# Altium PCB RTL8316_STAND.PcbDoc (part 2 of 4)
Units mm, origin at the board's own origin, x right, y up, seen from the top; angles counter-clockwise.
Board outline 155 x 217 mm, 4 copper layers (Top, Ground, Power, Bottom), stack 1.012 mm thick; 305 components, 396 nets, 1247 pads, 345 vias.
Unrouted connection lines stored in the file: 59.
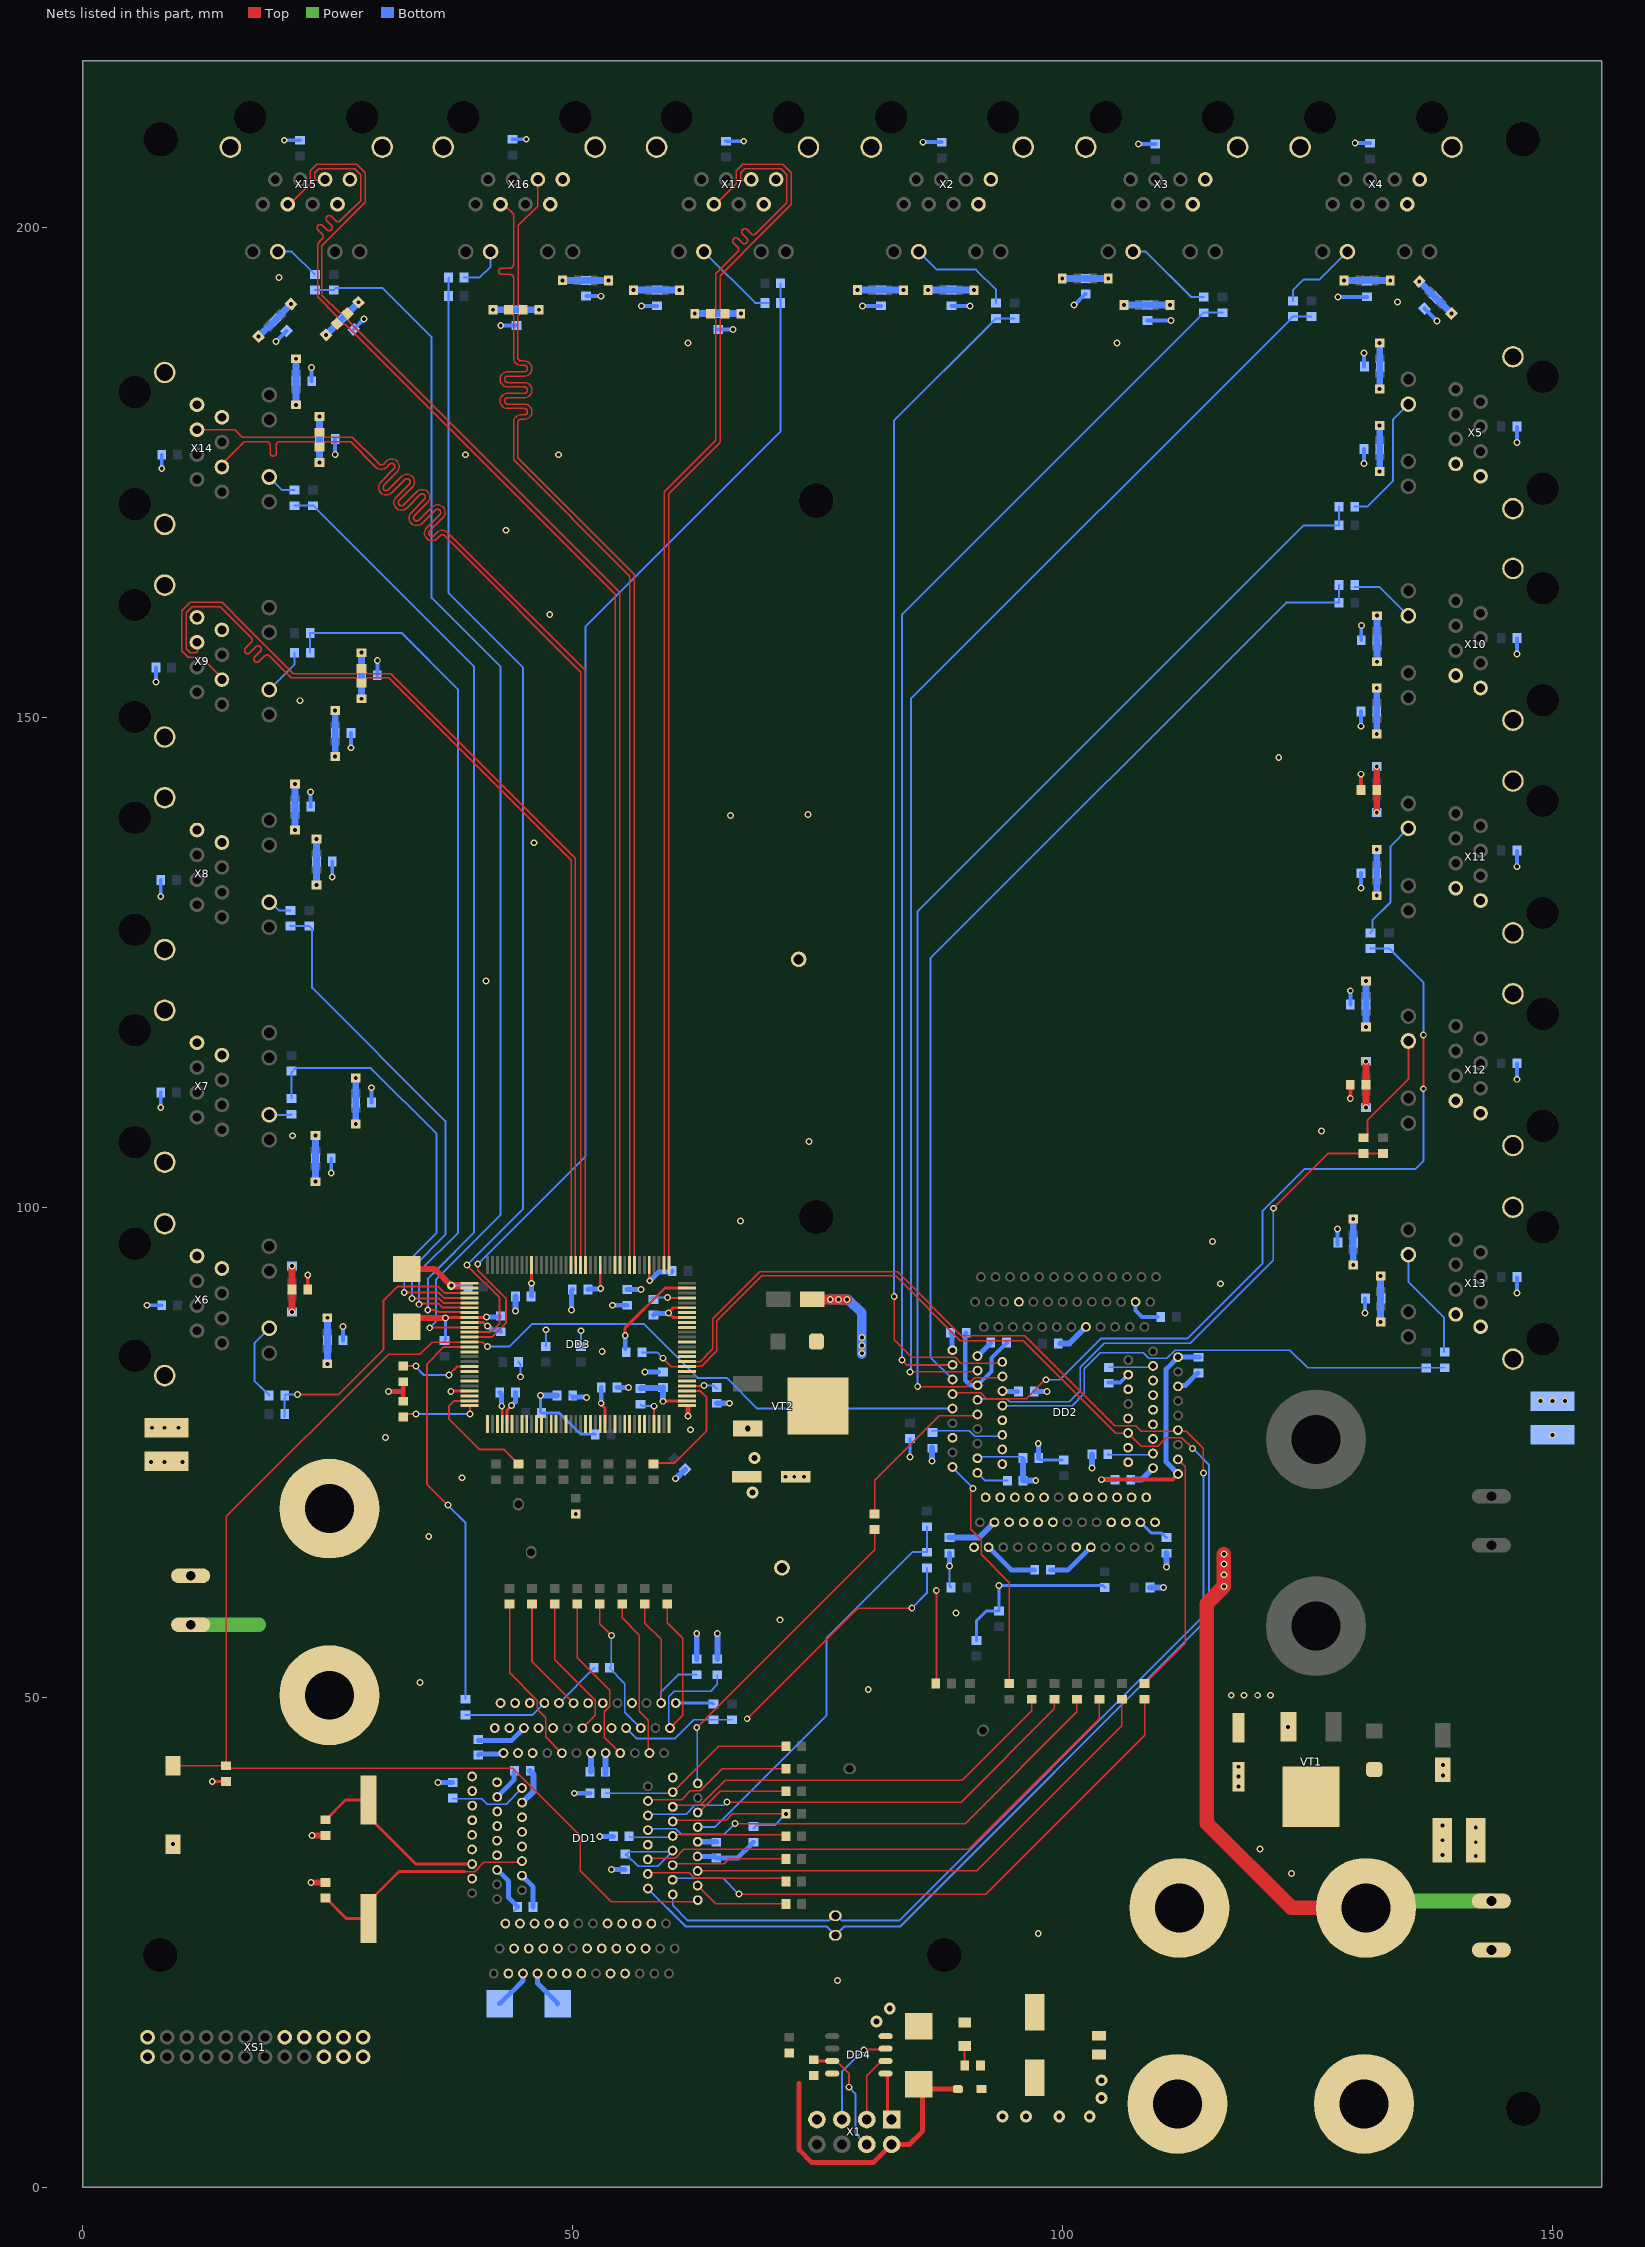
[diagram p4: the nets of this part, all layers, seen from the top]

## Via types
v1: diameter 0.7, hole 0.4, Top to Bottom, tented both sides, 332 vias
v2: diameter 1.2, hole 0.6, Top to Bottom, tented both sides, 11 vias
v3: diameter 0.9, hole 0.4, Top to Bottom, tented both sides, 2 vias

## Nets (pads, with @x,y where several pads share a name; then routed paths per layer and width w, separated by ;. In a path a pad name is that pad's centre, name@x,y a point inside that pad or via, vN(x,y) a via of type N, cw(c..) or ccw(c..) an arc to the next point about the centre after c; other vN are vias at no path point) (continued)
3V3: C4.1 C5.1 C13.1 C14.1 C27.1 C30.1 C31.1 C32.1 C33.1 C34.1 C35.1 C36.1 C37.1 DD3.46 DD3.68 DD3.103 DD3.127 R1.1 R3.1 R7.1 R11.1 R16.1 R34.1 R37.1 R71.2 R73.2 R74.2 SB2.1 SB3.1 VD1.1 VT1.2 VT2.2 XS2.1 XS3.1 XS4.1 | length 51.9
  Top w0.2: DD3.103@61.65,79.75 DD3.103@61.7,79.75
  Top w0.3: v1(13.2,41.4) R73.2@14.6,41.4 ; v1(37,88.7) 37.05,88.75 DD3.46@39.45,88.75 41.15,88.75 v1(41.2,88.8) ; v1(42.75,79.7) 42.8,79.65 DD3.68@42.8,77.9 ; v1(55.35,86.9) 55.35,87.7 59.4,91.75 DD3.127@61.65,91.75
  Top w0.5: v1(61.75,78.7) DD3.103@61.75,79.6 ; v2(67.85,77.42) VT2.2@68.35,76.92 ; C4.1@67.95,72.7 C4.1@67.75,72.5 68,72.5 C4.1@68.35,72.15 ; C13.1@97.1,11.2 C13.1@97.15,11.15
  Top w0.6: C27.1@33.85,88.6 33.95,88.7 v1(37,88.7)
  Top w0.7: VT1.2@122.95,46.9 VT1.2@123.05,47
  Top w1: C5.1@117.9,46.85 C5.1@117.95,46.9
  Bottom w0.2: C30.1@42.55,88.8 C30.1@42.65,88.9 ; R11.1@44.45,84.25 R11.1@44.45,84.2 44.65,84 v1(44.65,82.7) ; R7.1@47.25,85.8 v1(47.25,87.5) ; R3.1@50.85,85.8 v1(50.85,87.4) ; R74.2@55.35,85.582 R74.2@55.45,85.482 ; 58.668,83.282 C34.1@58.75,83.2
  Bottom w0.3: R16.1@36.9,86.4 37,86.5 v1(37,88.7) ; v1(46.7,80.8) 46.7,79.1 R1.1@46.8,79 48.625,79 50.775,76.85 52.25,76.85 R37.1@52.3,76.8
  Bottom w0.5: v1(41.2,88.8) C30.1@42.55,88.8 ; C31.1@42.55,81.1 42.712,80.938 42.712,79.738 v1(42.75,79.7) ; v1(49.85,89.5) 49.85,91.5 C37.1@49.95,91.6 ; v1(54.05,90) C36.1@55.55,90 ; C33.1@54.5,81.6 v1(55.7,81.6) ; R74.2@55.35,85.582 v1(55.35,86.9) ; v1(57.35,83.2) C34.1@58.75,83.2
  Bottom w0.6: v1(44.15,89.4) C35.1@44.15,90.9 ; v1(46.7,80.8) C32.1@48.4,80.8
  other v1: 123,46.95 117.2,50.2 118.5,50.2 119.9,50.2 121.2,50.2 50.3,68.7
  other v2: 93.85,7.2 96.25,7.2 99.65,7.2 102.75,7.2 103.95,9.1 103.95,10.9 68.35,70.9 68.55,74.4
3V3_8208_DUT: C15.1 C16.1 C17.1 C18.1 C19.1 C20.1 C21.1 C22.1 DD2.46 DD2.68 DD2.103 DD2.127 R2.1 R4.1 R8.1 R12.1 R15.1 R33.1 R38.1 SB3.2 XS4.2 | length 142.4
  Top w0.2: R12.1@87.05,51.4 87.1,51.45 v1(87.1,60.9)
  Top w0.4: v1@103.959,72.2 111.185,72.2 DD2.103@111.77,72.785
  Top w1.5: v1(116.45,64.6) v1(116.45,63.6) v1(116.45,62.5) v1(116.45,61.3) 114.7,59.55 114.7,37.15 123.35,28.5 XS4.2@130.95,28.5
  Power w1: XS4.2@130.95,28.5 XS4.2@131.65,29.2 ; SB3.2@143.75,29.2 SB3.2@144.411,29.2
  Power w1.5: XS4.2@131.65,29.2 SB3.2@143.75,29.2
  Bottom w0.2: v1(88.45,63.4) 88.45,61.35 R8.1@88.6,61.2 ; C21.1@113.945,84.705 C21.1@113.95,84.7
  Bottom w0.3: v1(84.4,74.5) R15.1@84.4,76.4 ; R2.1@91.2,55.8 91.2,57.8 92.2,58.8 R4.1@93.5,58.8 v1(93.5,61.4) 104.1,61.4 R38.1@104.3,61.2 ; C17.1@97.55,74.4 97.75,74.2 R33.1@99.988,74.2
  Bottom w0.4: DD2.46@91.31,81.84 92.723,83.253 92.723,84.623 C22.1@94.25,86.15
  Bottom w0.5: v1(88.45,63.4) C19.1@88.45,64.7 ; C20.1@90.15,87.2 90.05,87.1 90.05,82.35 90.56,81.84 DD2.46@91.31,81.84 ; DD2.68@92.44,65.3 94.74,63 C16.1@97.145,63 ; C22.1@94.25,86.15 C22.1@94.25,86.2 ; C15.1@97.1,81.2 v1(98.4,81.2) ; v1(97.5,75.9) 97.525,75.875 97.525,74.425 C17.1@97.55,74.4 ; v1(103.95,72.2) C18.1@105.35,72.2 ; DD2.103@111.77,72.785 110.55,74.005 110.55,83.485 DD2.127@111.77,84.705 C21.1@113.945,84.705
3V3_8316: C6.1 C7.1 C8.1 C9.1 C10.1 C11.1 C12.1 DD1.10 DD1.14 DD1.15 DD1.19 DD1.25 DD1.32 DD1.43 DD1.54 DD1.59 DD1.60 DD1.71 DD1.83 DD1.96 DD1.112 DD1.128 R19.1 R23.1 R30.1 R36.1 SB2.2 XS1.1 XS1.3 XS1.5 XS1.7 XS1.9 XS3.2 | length 66.2
  Top w0.15: v1(67.8,47.8) 79.1,59.1 v1(84.6,59.1)
  Power w1.5: SB2.2@11,57.4 17.95,57.4
  Bottom w0.2: C7.1@45.95,28.6 C7.1@45.965,28.585 ; DD1.25@48.59,49.4 48.6,49.4 52.15,52.95 R30.1@52.15,53 ; C9.1@53.35,42.2 C9.1@53.355,42.205 ; C10.1@64.495,33.755 C10.1@64.65,33.6 ; R23.1@68.2,34.993 68.407,35.2 R23.1@68.45,35.2 ; v1(84.6,59.1) 86.15,60.65 R36.1@86.15,63.2
  Bottom w0.5: C11.1@40.35,45.6 43.765,45.6 DD1.32@45.015,46.85 ; DD1.43@42.29,39.83 43.98,41.52 C8.1@43.98,42.38 ; C6.1@42.527,18.727 43.65,19.85 43.7,19.85 44.914,21.064 44.914,21.796 DD1.71@44.91,21.8 ; DD1.59@44.815,31.785 45.95,30.65 C7.1@45.95,28.6 ; v1(52.75,35.8) R19.1@54.15,35.8 ; v1(53.95,32.4) C12.1@55.35,32.4 ; DD1.112@62.74,33.755 C10.1@64.495,33.755 ; C10.1@64.65,33.6 66.85,33.6 68.2,34.95 68.2,35 68.4,35.2 R23.1@68.45,35.2
  Bottom w0.6: C9.1@53.355,42.205 DD1.15@53.355,44.3
AGND: C20.2 C21.2 C22.2 C25.2 C26.2 C27.2 C28.2 C29.2 C35.2 C36.2 C37.2 C38.2 C39.2 C40.2 C41.2 C42.2 C43.2 C44.2 C45.2 C46.2 C47.2 C48.2 C49.2 C50.2 C51.2 C52.2 C53.2 C54.2 C55.2 C56.2 C57.2 C58.2 C59.2 C60.2 C61.2 C62.2 C63.2 C64.2 C65.2 C66.2 C67.2 C68.2 C69.2 C70.2 C71.2 C72.2 C73.2 C74.2 C75.2 C76.2 C77.2 C78.2 C79.2 C80.2 C81.2 C82.2 C83.2 C84.2 C85.2 DD2.5 DD2.15 DD2.29 DD2.39 DD2.40 DD2.121 DD2.123 DD3.5 DD3.15 DD3.29 DD3.39 DD3.40 DD3.121 DD3.123 L1.1 L2.1 R75.1 R76.1 TP7.1 X2.8 X2.13 X3.8 X3.13 X4.8 X4.13 X5.8 X5.13 X6.8 X6.13 X7.8 X7.13 X8.8 X8.13 X9.8 X9.13 X10.8 X10.13 X11.8 X11.13 X12.8 X12.13 X13.8 X13.13 X14.8 X14.13 X15.8 X15.13 X16.8 X16.13 X17.8 X17.13 | length 122.6
  Top w0.2: v1@59.75,89.239 v1(59.75,89.2) v1@59.769,89.2
  Top w0.3: v3(37.6,92) v3@37.762,92 ; DD3.40@39.45,91.75 38.012,91.75 v3@37.762,92 ; DD3.39@39.45,92.25 38.012,92.25 v3@37.762,92 ; v1(45.8,92.25) DD3.29@45.8,94.1 ; DD3.15@52.8,94.1 52.8,91.75 v1(52.85,91.7) ; DD3.5@57.8,94.1 57.8,92.55 v1(57.85,92.5) ; v1@59.75,89.239 60.261,89.75 DD3.123@61.65,89.75 ; v1@59.769,89.2 60.219,88.75 DD3.121@61.65,88.75
  Top w0.4: C47.2@22.95,91.6 v1(22.95,93.1) ; v1@129.35,111.2 C59.2@129.35,112.5 ; C56.2@130.45,142.6 v1(130.45,144.2)
  Top w0.6: C27.2@33.05,93.7 35.9,93.7 v3(37.6,92)
  Top w1: X13.13@145.95,84.423 X13.13@145.95,84.5
  Bottom w0.2: C35.2@45.75,90.9 C35.2@45.8,90.95 ; C20.2@88.435,87.215 C20.2@88.585,87.215
  Bottom w0.4: v1(6.55,90) C70.2@8.05,90 ; v1(7.45,153.6) C83.2@7.45,155.1 ; v1(7.95,110.2) C71.2@7.95,111.7 ; v1(7.95,131.7) C75.2@7.95,133.4 ; v1(8.05,175.4) C82.2@8.05,176.8 ; v1(19.706,188.356) C64.2@20.767,189.417 ; v1(20.55,208.9) C78.2@22.15,208.9 ; C50.2@23.225,140.878 v1(23.225,142.378) ; C62.2@23.35,184.3 v1(23.35,185.7) ; v1(25.35,103.5) C48.2@25.35,105 ; v1(25.45,133.7) C51.2@25.45,135.3 ; v1(25.751,176.817) C63.2@25.751,178.417 ; C46.2@26.55,86.425 v1(26.55,87.825) ; v1(27.35,146.9) C52.2@27.35,148.4 ; C65.2@27.647,189.607 v1(28.708,190.668) ; C49.2@29.45,110.7 v1(29.45,112.2) ; C53.2@30.05,154.3 v1(30.05,155.8) ; v1(42.65,190) C67.2@44.25,190 ; C79.2@43.85,209 v1(45.25,209) ; C66.2@51.391,192.984 v1@52.791,192.984 ; v1(57,192) C68.2@58.6,192 ; C69.2@64.85,189.6 v1(66.35,189.6) ; C74.2@65.65,208.8 v1(67.45,208.8) ; v1(79.55,192) C38.2@81.45,192 ; v1(85.75,208.7) C85.2@87.65,208.7 ; C39.2@88.65,192 v1(90.55,192) ; DD2.40@91.3,84.82 DD2.40@91.3,84.952 ; v1(101.15,192.1) 101.2,192.1 102.3,193.2 C40.2@102.35,193.2 ; R76.1@104.65,82.1 105.87,82.1 DD2.123@106.685,82.915 ; DD2.5@107.445,90.35 107.445,89.455 108.1,88.8 C29.2@109.7,88.8 ; v1(107.75,208.5) C81.2@109.45,208.5 ; C41.2@108.65,190.5 v1(111.05,190.5) ; DD2.121@111.77,81.725 DD2.121@111.875,81.83 ; C21.2@113.8,83.1 C21.2@113.85,83.1 ; C60.2@128.05,96.195 128.05,96.4 v1(128.05,97.8) ; v1(128.1,192.9) 128.111,192.911 131.057,192.911 C43.2@131.068,192.922 ; v1(129.35,111.1) v1@129.35,111.2 ; C58.2@129.35,120.7 v1(129.35,122.1) ; v1(129.85,208.6) C80.2@131.35,208.6 ; v1(130.45,132.6) C57.2@130.45,134.1 ; v1(130.45,149.1) C54.2@130.45,150.6 ; C55.2@130.465,157.88 v1@130.465,159.38 ; v1(130.75,175.9) C45.2@130.75,177.4 ; C44.2@130.75,185.8 v1(130.75,187.2) ; v1(130.85,89.2) C61.2@130.85,90.7 ; C42.2@136.909,191.707 v1(138.182,190.434) ; v1(146.35,91.26) C77.2@146.35,92.86 ; v1(146.35,113.06) C76.2@146.35,114.66 ; v1(146.35,134.76) C84.2@146.35,136.36 ; v1(146.35,156.46) C73.2@146.35,158.06 ; v1(146.35,178.06) C72.2@146.35,179.66
  Bottom w0.5: v3(37.6,92) 39.5,92 C26.2@39.5,92.05 ; C35.2@45.8,90.95 v1(45.8,92.25) ; C37.2@51.55,91.6 51.612,91.662 52.812,91.662 v1(52.85,91.7) ; C36.2@55.55,91.6 v1(56.95,91.6) ; v1(57.85,92.5) 57.881,92.5 58.781,93.4 60.05,93.4 C25.2@60.15,93.5 ; R75.1@58.25,89 58.412,89.162 59.712,89.162 v1(59.75,89.2) ; C20.2@88.585,87.215 88.7,87.1 88.7,85.465 DD2.39@88.75,85.415 ; DD2.40@91.3,84.82 91.32,84.82 92.65,86.15 C22.2@92.65,86.2 ; DD2.121@111.875,81.83 112.53,81.83 C21.2@113.8,83.1
  Bottom w0.6: C28.2@99.75,86.1 100.675,86.1 DD2.15@102.375,87.8
  other v1: 7.05,77.5 8.35,77.5 9.75,77.5 148.75,80.25 150,80.25 151.25,80.25 130.475,159.375 52.869,192.984
DGND: C1.2 C2.2 C3.2 C4.2 C5.2 C6.2 C7.2 C8.2 C9.2 C10.2 C11.2 C12.2 C15.2 C16.2 C17.2 C18.2 C19.2 C23.2 C24.2 C30.2 C31.2 C32.2 C33.2 C34.2 DD1.1 DD1.18 DD1.26 DD1.33 DD1.36 DD1.44 DD1.55 DD1.58 DD1.70 DD1.74 DD1.91 DD1.97 DD1.113 DD1.115 DD2.47 DD2.61 DD2.69 DD2.89 DD2.104 DD3.47 DD3.61 DD3.69 DD3.89 DD3.104 DD4.4 L3.2 R22.1 R26.1 R27.1 R35.1 R41.1 R42.1 R49.1 R50.1 R55.1 R56.1 R61.1 R62.1 R67.1 R68.1 R72.2 SB1.1 TP8.1 VD2.1 X1.7 XS1.2 XS1.4 XS1.6 XS1.23 XS1.24 | length 115.5
  Top w0.2: v1(37.55,81.2) 37.75,81.2 v1@37.8,81.25
  Top w0.3: v1@37.8,81.25 DD3.61@39.45,81.25 ; DD3.47@39.45,88.25 40.842,88.25 41.192,87.9 v1(41.3,87.9) ; DD3.69@43.3,77.9 43.3,79.304 v1(43.75,79.754) ; v1(52.9,80) 52.9,79.892 53.3,79.492 DD3.89@53.3,77.9 ; v1(59.2,80.2) 59.25,80.25 DD3.104@61.65,80.25
  Top w0.4: v1(117.95,41.9) 117.95,42.85 C5.2@118,42.9
  Top w0.5: v1(31.2,81.2) 32.7,81.2 ; R62.1@32.7,80.2 32.7,81.2 ; R68.1@32.7,82.2 32.7,81.2 ; C4.2@72.75,72.5 v1(73.6,72.5)
  Top w0.6: v1(23.3,31.1) C3.2@24.75,31.1 ; v1(23.4,35.9) C2.2@24.75,35.9 ; v1(138.75,35.4) L3.2@138.8,35.45 ; C23.2@138.8,42.6 v1(138.8,43.1)
  Top w1: C24.2@74.45,90.6 v1(78,90.6)
  Bottom w0.15: C12.2@55.35,33.8 55.35,33.82 55.75,34.22 60.06,34.22 DD1.113@60.19,34.35 60.115,34.275 60.115,34.165 58.68,32.73 56.67,32.73 55.465,33.935 55.4,34 C12.2@55.35,34 ; DD2.61@91.43,74.52 C17.2@95.95,74.52
  Bottom w0.2: DD1.55@42.28,33.87 DD1.55@42.41,34 ; C7.2@44,28.2 C7.2@44.35,28.55 ; C32.2@49.7,80.9 C32.2@50,80.6 ; C10.2@64.605,35.245 C10.2@64.65,35.2 ; DD2.61@91.17,74.26 DD2.61@91.43,74.52 ; C16.2@98.745,63 C16.2@98.765,63.02
  Bottom w0.3: DD1.33@44.55,43.989 44.539,44 44.539,44.154 DD1.33@44.55,44.165 ; DD1.1@60.51,49.4 64.25,49.4 R35.1@64.35,49.3
  Bottom w0.5: v1(36.25,41.3) R72.2@37.75,41.3 ; C11.2@40.35,44.1 40.45,44.2 42.703,44.2 42.803,44.3 DD1.36@42.925,44.3 ; v1(41.3,87.9) 41.354,87.9 41.754,87.5 42.45,87.5 C30.2@42.65,87.3 ; DD1.58@42.28,32.38 43.45,31.21 43.45,29.55 44.35,28.65 C7.2@44.35,28.6 ; v1(43.75,79.754) 44.139,80.143 44.139,81.089 C31.2@44.15,81.1 ; DD1.33@44.415,44.178 DD1.33@44.415,44.3 ; DD1.74@46.4,21.8 46.4,20.8 48.45,18.75 C6.2@48.45,18.7 ; C32.2@50,80.6 50.038,80.638 51.362,80.638 v1(51.4,80.6) ; v1(50.15,40.2) R27.1@51.75,40.2 ; v1(52.9,80) C33.2@52.9,81.6 ; DD2.47@93.845,81.245 93.881,81.209 C15.2@95.4,81.209 ; C16.2@98.745,63 100.57,63 DD2.89@102.87,65.3
  Bottom w0.6: DD1.44@44.825,39.235 46,40.41 46,42.1 45.65,42.45 C8.2@45.65,42.5 ; C9.2@51.865,42.4 DD1.18@51.865,44.29 ; R56.1@56.9,81.5 56.95,81.55 59.15,81.55 C34.2@59.2,81.6 v1(59.2,80.2) ; v1(60.5,72.3) 60.516,72.3 61.45,73.234 R41.1@61.466,73.234 ; R26.1@62.65,53.9 v1(62.65,56.5) ; DD1.115@62.75,35.245 C10.2@64.605,35.245 ; R50.1@64.7,80 v1(66,80) ; R22.1@64.75,53.9 v1(64.75,56.5) ; v1(86.65,74.1) R67.1@86.65,75.5 ; C19.2@88.45,66.3 91.485,66.3 DD2.69@93.035,67.85 ; C17.2@95.95,74.2 R61.1@95.95,72.1 v1(97.25,72.1) ; v1(103,73.4) R49.1@103,74.8 ; C18.2@107.25,72.2 108.04,72.2 DD2.104@109.22,73.38 ; R42.1@108.9,61.2 v1(110.3,61.2) ; v1(110.6,63.3) R55.1@110.6,64.7
  Bottom w1: v1(76.275,90.6) 78.1,90.6 79.5,89.2 v1(79.5,85.1) v1@79.5,85
  other v1: 138.75,33.9 9.2,35 138.75,36.9 117.95,40.9 138.8,42 117.95,42.9 71.7,72.5 72.6,72.5 79.5,85.9 79.5,86.7 77.1,90.6
  other v2: 81,16.9 82.344,18.244
EEP_PWR: C1.1 DD4.8 R69.2 R70.2 VD1.2 X1.2 | length 29.5
  Top w0.5: 73.1,10.6 73.1,3.8 74.4,2.5 80.68,2.5 X1.2@82.54,4.36 84.36,4.36 85.7,5.7 85.7,10 VD1.2@89.3,10 ; R69.2@74.4,11.5 R69.2@74.63,11.27 ; DD4.8@76.438,11.558 DD4.8@76.475,11.595
G+1: R141.1 X17.10 | length 8.8
  Bottom w0.2: X17.10@63.38,197.53 68.61,192.3 R141.1@70,192.3
G+2: R145.1 X16.10 | length 4.7
  Bottom w0.2: R145.1@38.9,194.9 40.5,194.9 41.605,196.005 X16.10@41.605,197.53
G+3: R149.1 X15.10 | length 4.8
  Bottom w0.2: X15.10@19.885,197.53 21.32,197.53 23.65,195.2 R149.1@23.7,195.2
G+4: R153.1 X14.10 | length 3.1
  Bottom w0.2: X14.10@19.02,174.53 20.35,173.2 R153.1@21.6,173.2
G+5: R157.1 X9.10 | length 4.8
  Bottom w0.2: X9.10@19.02,152.83 21.6,155.41 R157.1@21.6,156.6
G+6: R161.1 X8.10 | length 2.5
  Bottom w0.2: X8.10@19.02,131.13 19.17,131.13 20,130.3 R161.1@21.2,130.3
G+7: R165.1 X7.10 | length 2.3
  Bottom w0.2: X7.10@19.02,109.43 21.23,109.43 R165.1@21.3,109.5
G+8: R169.1 X6.10 | length 8.1
  Bottom w0.2: R169.1@19,80.8 19,80.85 18.65,81.2 18.6,81.2 17.5,82.3 17.5,86.135 X6.10@19.02,87.655
G+9: R142.2 X13.10 | length 11.5
  Bottom w0.2: X13.10@135.28,95.17 135.28,92.382 138.9,88.762 138.9,85.303 R142.2@138.988,85.215
G+10: R146.2 X12.10 | length 11.8
  Top w0.2: R146.2@130.7,107.1 130.75,107.1 131.1,107.45 131.1,108.9 135.28,113.08 X12.10@135.28,116.97
G+11: R150.2 X11.10 | length 12.3
  Bottom w0.2: R150.2@131.4,128 131.6,128.2 131.6,129.3 133.456,131.156 133.456,136.846 X11.10@135.28,138.67
G+12: R154.2 X10.10 | length 6.7
  Bottom w0.2: R154.2@129.8,163.3 132.35,163.3 X10.10@135.28,160.37
G+13: R158.2 X5.10 | length 13.5
  Bottom w0.2: R158.2@129.8,171.5 131.1,171.5 133.7,174.1 133.7,180.39 X5.10@135.28,181.97
G+14: R162.2 X4.10 | length 8.3
  Bottom w0.2: R162.2@123.5,192.5 123.5,193.6 124.6,194.7 126.23,194.7 X4.10@129.06,197.53
G+15: R166.2 X3.10 | length 9.1
  Bottom w0.2: X3.10@107.18,197.53 108.47,197.53 113.1,192.9 R166.2@114.4,192.9
G+16: R170.2 X2.10 | length 10.8
  Bottom w0.2: X2.10@85.3,197.53 87.13,195.7 91.134,195.7 93.2,193.634 R170.2@93.2,192.3
GND: C13.2 C14.2 L1.2 L2.2 L3.1 XS2.2
  other v1: 77,21.1 97.5,25.9 123.35,32 142.15,33.8 120.15,34.5 142.15,35.2 142.15,36.7 80.15,50.8 34.4,51.5 71.15,57.9 89.1,58.6 35.3,66.4 38.7,72.4 6.95,74 8.35,74 10.15,74 30.9,76.5 150,76.75 62,77.3 53,85.3 116.1,92.2 115.3,96.5 67.1,98.6 74.1,106.7 21.4,107.3 126.4,107.8 41.15,123.1 46.05,137.2 66.1,140 74,140.1 122.05,145.9 22.15,151.7 47.65,160.5 43.2,169.1 39.05,176.8 48.55,176.8 61.75,188.2 105.55,188.2 134.15,192.4 20,194.9
LED0: DD3.50 R141.2 R143.2 | length 124.4
  Top w0.2: DD3.50@39.45,86.75 41.716,86.75 43.2,88.234 43.2,90.666 40.3,93.566 v1(40.3,94.2)
  Bottom w0.2: v1(40.3,94.2) 51.3,105.2 51.3,159.3 71.2,179.2 R141.2@71.2,192.3 R143.2@71.2,194.3
LED1: DD3.49 R145.2 R147.2 | length 117.1
  Top w0.2: v1(39.2,94.1) 42.5,90.8 42.5,88.1 41.65,87.25 DD3.49@39.45,87.25
  Bottom w0.2: R145.2@37.3,194.9 R147.2@37.3,193 37.3,162.7 44.9,155.1 44.9,99.8 v1(39.2,94.1)
LED2: DD3.48 R149.2 R151.2 | length 125.1
  Top w0.2: v1(35.4,87.7) 35.45,87.75 DD3.48@39.45,87.75
  Bottom w0.2: R149.2@23.7,193.6 R151.2@25.6,193.6 25.8,193.8 30.6,193.8 35.6,188.8 35.6,162.2 42.6,155.2 42.6,99.2 36.05,92.65 36.05,88.35 v1(35.4,87.7)
LED3: DD3.45 R153.2 R155.2 | length 97.1
  Top w0.2: v1(35.2,89.5) 36.1,89.5 36.3,89.3 38.508,89.3 39.4,89.3 DD3.45@39.45,89.25
  Bottom w0.2: R153.2@21.6,171.6 R155.2@23.5,171.6 23.55,171.6 23.9,171.25 23.9,171.2 39.9,155.2 39.9,97.4 36.1,93.6 35.2,92.7 v1(35.2,89.5)
LED4: DD3.44 R157.2 R159.2 | length 89.3
  Top w0.2: v1(34.3,90.1) 34.435,90.1 34.535,90.2 36.263,90.2 36.713,89.75 DD3.44@39.45,89.75
  Bottom w0.2: R157.2@23.2,156.6 23.2,158.6 32.5,158.6 32.517,158.617 38.3,152.834 38.3,97.4 34.3,93.4 v1(34.3,90.1)
LED5: DD3.43 R161.2 R163.2 | length 53.1
  Top w0.2: v1(33.6,90.7) 36.329,90.7 36.779,90.25 DD3.43@39.45,90.25
  Bottom w0.2: R161.2@21.2,128.7 R163.2@23.1,128.7 23.4,128.4 23.4,122.4 37,108.8 37,97.2 33.6,93.8 v1(33.6,90.7)
LED6: DD3.42 R165.2 R167.2 | length 44.9
  Top w0.2: v1(32.8,91.3) 36.294,91.3 36.844,90.75 DD3.42@39.45,90.75
  Bottom w0.2: R165.2@21.3,111.1 21.3,113.8 21.7,114.2 29.4,114.2 36.1,107.5 36.1,97.4 32.8,94.1 v1(32.8,91.3)
LED7: DD3.41 R169.2 R171.2 | length 28.7
  Top w0.2: v1(21.9,80.9) 26.1,80.9 30.7,85.5 30.7,90.5 32.096,91.896 32.547,91.896 32.551,91.9 36.26,91.9 36.91,91.25 DD3.41@39.45,91.25
  Bottom w0.2: R171.2@20.6,78.6 20.6,80.5 R169.2@20.7,80.6 ; R169.2@20.6,80.8 20.7,80.9 v1(21.9,80.9)
LED8: DD2.50 R142.1 R144.1 | length 50.2
  Bottom w0.15: DD2.50@93.845,79.755 100.955,79.755 102.2,81 102.2,83.5 103.83,85.13 108.222,85.13 108.777,84.575 110.615,84.575 111.47,85.43 123.17,85.43 125,83.6 R144.1@137.1,83.6 137.115,83.615 R142.1@138.988,83.615
LED9: DD2.49 R146.1 R148.1 | length 56.6
  Top w0.2: v1(121.5,99.9) 127.1,105.5 R146.1@130.7,105.5 R148.1@132.7,105.5
  Bottom w0.15: DD2.49@91.31,80.35 91.44,80.48 94.275,80.48 94.6,80.155 100.655,80.155 101.8,81.3 101.8,83.666 104.234,86.1 113,86.1 121.5,94.6 v1(121.5,99.9)
LED10: DD2.48 R150.1 R152.1 | length 86.6
  Top w0.15: DD2.48@88.76,80.945 88.89,81.075 91.61,81.075 92.205,80.48 96.261,80.48 98.181,82.4 v1(98.3,82.4)
  Top w0.2: v1(136.8,112.1) v1(136.8,117.6)
  Bottom w0.2: v1(98.3,82.4) 99.7,82.4 103.9,86.6 112.7,86.6 120.4,94.3 120.4,99.649 124.651,103.9 135.983,103.9 136.8,104.717 v1(136.8,112.1) ; R150.1@131.4,126.4 R152.1@133.3,126.4 133.35,126.4 136.8,122.95 v1(136.8,117.6)
LED11: DD2.45 R154.1 R156.1 | length 102.4
  Bottom w0.2: DD2.45@88.76,82.435 86.5,84.695 86.5,125.4 122.8,161.7 R156.1@128.2,161.7 R154.1@128.2,163.5
LED12: DD2.44 R158.1 R160.1 | length 118.8
  Top w0.15: v1(85.2,81.7) 90.145,81.7 91.036,82.591 93.701,82.591 DD2.44@93.845,82.735
  Bottom w0.2: v1(85.2,81.7) 85.2,130.2 124.6,169.6 R160.1@128.2,169.6 R158.1@128.2,171.5
LED13: DD2.43 R162.1 R164.1 | length 132.8
  Top w0.15: v1(84.4,83.2) 91.18,83.2 DD2.43@91.31,83.33
  Bottom w0.2: v1(84.4,83.2) 84.496,83.296 84.496,83.563 84.5,83.567 84.5,151.9 123.1,190.5 123.1,190.55 123.45,190.9 R162.1@123.5,190.9 R164.1@125.4,190.9
LED14: DD2.42 R166.1 R168.1 | length 126.9
  Top w0.2: v1(83.6,84.4) 84.075,83.925 DD2.42@88.76,83.925
  Bottom w0.2: v1(83.6,84.4) 83.6,160.5 114,190.9 114,190.95 114.35,191.3 R166.1@114.4,191.3 R168.1@116.3,191.3
LED15: DD2.41 R170.1 R172.1 | length 122.5
  Top w0.15: v1(82.8,90.9) 82.8,86.5 84.61,84.69 89.02,84.69 89.615,84.095 93.705,84.095 DD2.41@93.835,84.225
  Bottom w0.2: v1(82.8,90.9) 82.8,180.3 92.8,190.3 92.8,190.35 93.15,190.7 R172.1@95.1,190.7
MDC: DD1.104 DD2.112 DD3.112 TP5.1 | length 152.4
  Top w0.15: DD3.112@61.65,84.25 63,84.25 64.3,85.55 64.3,88.6 69.1,93.4 83.15,93.4 89.65,86.9 96.15,86.9 105.33,77.72 107.43,77.72 108.025,77.125 111.63,77.125 DD2.112@111.76,77.255 111.89,77.124 112.626,77.124 114.35,75.4 v1(114.35,72.9)
  Bottom w0.2: DD1.104@60.2,29.88 60.2,28.75 61.75,27.2 76.1,27.2 76.6,27.7 76.936,27.7 77.436,27.2 83.3,27.2 114.35,58.25 v1(114.35,72.9) ; DD2.112@111.63,77.125 DD2.112@111.76,77.255
MDIO: DD1.105 DD2.111 DD3.111 R74.1 TP6.1 | length 161.1
  Top w0.15: v1(59.2,84.6) 60.05,83.75 DD3.111@61.65,83.75 61.7,83.8 63.15,83.8 64.7,85.35 64.7,88.4 69.3,93 82.95,93 89.55,86.4 95.95,86.4 105.395,76.955 DD2.111@106.675,76.955 107.995,75.635 109.702,75.635 110.557,76.49 112.16,76.49 v1(113.25,75.4)
  Bottom w0.2: R74.1@57.05,85.2 58.6,85.2 v1(59.2,84.6) ; DD1.105@57.665,30.475 61.54,26.6 75.9,26.6 TP6.1@76.8,25.7 77.7,26.6 83.4,26.6 114.95,58.15 114.95,73.7 v1(113.25,75.4)
NC1: DD4.1 X1.1 | length 5
  Top w0.3: DD4.1@81.925,11.595 81.961,11.595 82.1,11.456 82.1,7.34 X1.1@82.54,6.9
NC2: DD4.2 X1.3 | length 7
  Top w0.2: X1.3@80,6.9 80,11.365 81.5,12.865 DD4.2@81.925,12.865
NC3: DD4.3 X1.5 | length 10.3
  Top w0.2: v1(79.7,14) 79.768,14.068 81.857,14.068 DD4.3@81.925,14.135
  Bottom w0.2: X1.5@77.46,6.9 77.46,11.76 v1(79.7,14)
NetC2_1: C2.1 DD1.57 ZQ1.2 | length 20.4
  Top w0.3: C2.1@24.75,37.5 24.8,37.5 26.8,39.5 ZQ1.2@29.15,39.5 ZQ1.2@29.15,38.75 ; ZQ1.2@28.5,38.1 ZQ1.2@29.15,38.75 ; DD1.57@39.73,32.975 33.975,32.975 29.15,37.8 ZQ1.2@29.15,38.75
NetC3_1: C3.1 DD1.56 ZQ1.1 | length 24.4
  Top w0.15: 38.96,32.21 39.99,32.21 40.925,33.145 DD1.56@44.685,33.145
  Top w0.2: ZQ1.1@29.15,27.4 ZQ1.1@29.15,29.1 ; 38.95,32.2 38.96,32.21 ; DD1.56@44.685,33.145 DD1.56@44.815,33.275
  Top w0.3: C3.1@24.75,29.5 24.8,29.5 26.9,27.4 ZQ1.1@29.15,27.4 ; ZQ1.1@29.15,29.1 32.25,32.2 38.95,32.2
NetC38_1: C38.1 R77.2 R78.2 | length 4.7
  Bottom w0.7: v1(79.05,193.601) 83.749,193.601 v1(83.75,193.6)
NetC39_1: C39.1 R79.2 R80.2 | length 4.7
  Bottom w0.7: v1(86.25,193.601) 90.949,193.601 v1(90.95,193.6)
NetC40_1: C40.1 R81.2 R82.2 | length 4.7
  Bottom w0.7: v1(99.95,194.8) C40.1@102.35,194.8 v1(104.65,194.8)
NetC41_1: C41.1 R83.2 R84.2 | length 4.7
  Bottom w0.7: v1(106.25,192.1) v1(110.95,192.1)
NetC42_1: C42.1 R85.2 R86.2 | length 4.7
  Bottom w0.7: v1(136.388,194.501) 139.675,191.214 v1(139.675,191.204)
NetC43_1: C43.1 R87.2 R88.2 | length 4.7
  Bottom w0.7: v1(128.712,194.571) v1(133.424,194.571)
NetC44_1: C44.1 R89.2 R90.2 | length 4.7
  Bottom w0.7: v1(132.35,183.5) v1(132.35,188.2)
NetC45_1: C45.1 R91.2 R92.2 | length 4.7
  Bottom w0.7: v1(132.35,175.1) v1(132.35,179.8)
NetC46_1: C46.1 R93.2 R94.2 | length 4.7
  Bottom w0.7: v1(24.95,84.025) C46.1@24.95,86.425 v1(24.95,88.725)
NetC47_1: C47.1 R95.2 R96.2 | length 4.7
  Top w0.7: v1(21.35,89.3) v1(21.35,94)
NetC48_1: C48.1 R97.2 R98.2 | length 4.7
  Bottom w0.7: v1@23.75,102.6 v1@23.75,107.3
  other v1: 23.75,102.625 23.75,107.325
NetC49_1: C49.1 R99.2 R100.2 | length 4.7
  Bottom w0.7: v1(27.85,108.5) v1(27.85,113.2)
NetC50_1: C50.1 R101.2 R102.2 | length 4.7
  Bottom w0.7: v1(21.65,138.5) C50.1@21.65,140.9 v1(21.65,143.2)
NetC51_1: C51.1 R103.2 R104.2 | length 4.7
  Bottom w0.7: v1(23.85,132.9) v1(23.85,137.6)
NetC52_1: C52.1 R105.2 R106.2 | length 4.7
  Bottom w0.7: v1(25.75,146) C52.1@25.75,148.4 v1(25.75,150.7)
NetC53_1: C53.1 R107.2 R108.2 | length 4.7
  Bottom w0.7: v1(28.45,151.9) v1(28.45,156.6)
NetC54_1: C54.1 R109.2 R110.2 | length 4.7
  Bottom w0.7: v1(132.05,148.3) C54.1@132.05,150.6 v1(132.05,153)
NetC55_1: C55.1 R111.2 R112.2 | length 4.7
  Bottom w0.7: v1(132.075,155.675) 132.075,160.374 v1(132.077,160.375)
NetC56_1: C56.1 R113.2 R114.2 | length 4.7
  Top w0.7: v1(132.05,140.3) 132.051,140.301 v1(132.051,145)
NetC57_1: C57.1 R115.2 R116.2 | length 4.7
  Bottom w0.7: v1(132.05,131.8) C57.1@132.05,134.1 v1(132.05,136.5)
NetC58_1: C58.1 R117.2 R118.2 | length 4.7
  Bottom w0.7: v1(130.95,118.4) 130.951,118.401 v1(130.951,123.1)
NetC59_1: C59.1 R119.2 R120.2 | length 4.7
  Top w0.7: v1(130.95,110.2) v1(130.951,114.9)
  Bottom w0.7: v1(130.95,110.2) v1(130.95,110.2)
NetC60_1: C60.1 R121.2 R122.2 | length 4.7
  Bottom w0.7: v1(129.65,94.1) v1(129.65,98.8)
NetC61_1: C61.1 R123.2 R124.2 | length 4.7
  Bottom w0.7: v1(132.45,88.3) 132.45,90.7 v1(132.45,93)
NetC62_1: C62.1 R125.2 R126.2 | length 4.7
  Bottom w0.7: v1(21.75,181.9) C62.1@21.75,184.3 v1(21.75,186.6)
NetC63_1: C63.1 R127.2 R128.2 | length 4.7
  Bottom w0.7: v1(24.15,176) C63.1@24.15,178.4 v1(24.15,180.7)
NetC64_1: C64.1 R129.2 R130.2 | length 4.7
  Bottom w0.7: v1(17.939,188.851) C64.1@19.636,190.549 v1(21.262,192.175)
NetC65_1: C65.1 R131.2 R132.2 | length 4.7
  Bottom w0.7: v1(24.819,189.041) v1(28.142,192.365)
NetC66_1: C66.1 R133.2 R134.2 | length 4.7
  Bottom w0.7: v1@48.951,194.6 C66.1@51.35,194.6 v1(53.65,194.6)
  other v1: 48.95,194.601
NetC67_1: C67.1 R135.2 R136.2 | length 4.7
  Bottom w0.7: v1(41.85,191.6) v1(46.55,191.6)
NetC68_1: C68.1 R137.2 R138.2 | length 4.7
  Bottom w0.7: v1(56.2,193.6) v1(60.9,193.6)
NetC69_1: C69.1 R139.2 R140.2 | length 4.7
  Bottom w0.7: v1(62.45,191.2) C69.1@64.85,191.2 67.146,191.2 v1(67.15,191.196)
NetDD1_6: DD1.6 R13.2 | length 16.3
  Top w0.15: R13.2@55.05,59.5 55.05,58.1 56.805,56.345 56.805,48.545 57.7,47.65 57.7,44.425 DD1.6@57.825,44.3
NetDD1_11: DD1.11 R35.2 R40.2 | length 12
  Bottom w0.2: DD1.11@55.445,46.85 56.495,45.8 60.45,45.8 62.35,47.7 R35.2@64.35,47.7 R40.2@66.25,47.7
NetDD1_12: DD1.12 R20.2 | length 17.5
  Top w0.15: R20.2@50.45,59.5 50.45,54.03 53.785,50.695 53.785,49.09 53.23,48.535 53.23,45.915 DD1.12@54.845,44.3
NetDD1_16: DD1.16
NetDD1_17: DD1.17
NetDD1_20: DD1.20 R24.2 | length 14.9
  Top w0.15: R24.2@48.15,59.5 48.15,53.835 52.295,49.69 52.295,48.16 DD1.20@50.975,46.84
NetDD1_22: DD1.22 R28.2 | length 12
  Top w0.15: 45.85,53.62 DD1.22@50.08,49.39
  Top w0.2: 45.85,53.62 R28.2@45.85,59.5 R28.2@45.85,59.6
NetDD1_24: DD1.24 R31.2 | length 17.5
  Top w0.15: R31.2@43.55,59.6 R31.2@43.55,59.5 43.55,52.485 46.375,49.66 46.375,48.775 47.23,47.92 47.23,45.945 DD1.24@48.885,44.29
NetDD1_28: DD1.28 R44.2 | length 8.5
  Bottom w0.2: R44.2@39.05,48.2 45.9,48.2 DD1.28@47.1,49.4
NetDD1_29: DD1.29
NetDD1_30: DD1.30
NetDD1_31: DD1.31
NetDD1_34: DD1.34
NetDD1_35: DD1.35
NetDD1_37: DD1.37
NetDD1_38: DD1.38
NetDD1_39: DD1.39
NetDD1_40: DD1.40
NetDD1_41: DD1.41 R72.1 | length 8
  Bottom w0.15: R72.1@37.75,39.7 37.79,39.66 40.69,39.66 41.25,39.1 43.19,39.1 DD1.41@44.815,40.725
NetDD1_42: DD1.42
NetDD1_45: DD1.45
NetDD1_46: DD1.46
NetDD1_47: DD1.47
NetDD1_48: DD1.48
NetDD1_49: DD1.49
NetDD1_50: DD1.50
NetDD1_51: DD1.51
NetDD1_52: DD1.52
NetDD1_53: DD1.53
NetDD1_67: DD1.67
NetDD1_68: DD1.68
NetDD1_69: DD1.69
NetDD1_72: DD1.72
NetDD1_73: DD1.73
NetDD1_75: DD1.75
NetDD1_76: DD1.76
NetDD1_77: DD1.77
NetDD1_78: DD1.78
NetDD1_79: DD1.79
NetDD1_80: DD1.80
NetDD1_84: DD1.84
NetDD1_87: DD1.87
NetDD1_88: DD1.88
NetDD1_89: DD1.89
NetDD1_90: DD1.90
NetDD1_92: DD1.92
NetDD1_93: DD1.93
NetDD1_94: DD1.94
NetDD1_106: DD1.106 R6.2 | length 9.8
  Top w0.15: DD1.106@62.74,30.775 64.615,28.9 R6.2@71.75,28.9
NetDD1_108: DD1.108 R10.2 | length 14.5
  Top w0.15: DD1.108@57.655,31.965 57.785,32.095 61.885,32.095 62.44,31.54 71.41,31.54 R10.2@71.75,31.2
NetDD1_110: DD1.110 R14.2 | length 11.8
  Top w0.15: DD1.110@60.19,32.86 60.32,32.99 65.44,32.99 65.95,33.5 R14.2@71.75,33.5
NetDD1_114: DD1.114
NetDD1_118: DD1.118 R36.2 R39.2 | length 42.3
  Bottom w0.2: DD1.118@62.75,36.735 64.485,36.735 75.874,48.124 75.874,56.024 84.65,64.8 R36.2@86.15,64.8 R39.2@86.15,67.4
NetDD1_121: DD1.121 R25.2 | length 9.9
  Top w0.15: DD1.121@62.75,38.225 62.875,38.225 65.05,40.4 R25.2@71.75,40.4
NetDD1_123: DD1.123 R29.2 | length 15.4
  Top w0.15: DD1.123@57.665,39.415 57.795,39.545 61.095,39.545 61.99,40.44 63.01,40.44 65.27,42.7 R29.2@71.75,42.7
NetDD1_127: DD1.127 R43.2 | length 33.5
  Top w0.15: v1(62.65,46.9) 80.8,65.05 R43.2@80.8,67.1
  Bottom w0.2: v1(62.65,46.9) 62.7,46.85 62.7,41.255 DD1.127@62.75,41.205
NetDD2_53: DD2.53
NetDD2_56: DD2.56 R67.2 | length 7.5
  Bottom w0.15: R67.2@86.65,77.1 86.75,77.2 90.445,77.2 91,76.645 93.705,76.645 DD2.56@93.835,76.775
NetDD2_57: DD2.57
NetDD2_59: DD2.59
NetDD2_62: DD2.62
NetDD2_63: DD2.63 R57.2 | length 24.7
  Top w0.15: v1(90.85,71.3) 90.85,71.165 90.625,70.94 90.625,67.125 91.675,66.075 91.675,64.575 94.55,61.7 R57.2@94.55,51.4
  Bottom w0.2: DD2.63@88.75,73.495 88.75,73.447 90.85,71.347 v1(90.85,71.3)
NetDD2_64: DD2.64 R61.2 | length 3.4
  Bottom w0.2: DD2.64@91.3,72.9 92.1,72.1 R61.2@94.35,72.1
NetDD2_65: DD2.65
NetDD2_67: DD2.67
NetDD2_70: DD2.70
NetDD2_72: DD2.72
NetDD2_73: DD2.73
NetDD2_75: DD2.75
NetDD2_76: DD2.76
NetDD2_78: DD2.78
NetDD2_79: DD2.79
NetDD2_81: DD2.81
NetDD2_85: DD2.85
NetDD2_86: DD2.86
NetDD2_88: DD2.88
NetDD2_91: DD2.91
NetDD2_93: DD2.93
NetDD2_94: DD2.94
NetDD2_96: DD2.96
NetDD2_97: DD2.97
NetDD2_99: DD2.99 R55.2 | length 3.3
  Bottom w0.3: DD2.99@107.935,67.85 109.035,66.75 110.1,66.75 110.55,66.3 R55.2@110.6,66.3
NetDD2_100: DD2.100
NetDD2_102: DD2.102
NetDD2_105: DD2.105
NetDD2_106: DD2.106 R45.2 | length 24.9
  Top w0.15: R45.2@108.35,51.4 108.4,51.4 112.495,55.495 112.495,73.54 DD2.106@111.76,74.275
NetDD2_107: DD2.107 R49.2 | length 4.7
  Bottom w0.15: R49.2@104.66,74.74 DD2.107@109.08,74.74
  Bottom w0.2: R49.2@104.6,74.8 R49.2@104.66,74.74 ; DD2.107@109.08,74.74 DD2.107@109.21,74.87
NetDD2_108: DD2.108
NetDD2_110: DD2.110
NetDD2_113: DD2.113
NetDD2_114: DD2.114
NetDD2_116: DD2.116
NetDD2_119: DD2.119
NetDD2_120: DD2.120
NetDD2_122: DD2.122
NetDD2_125: DD2.125 R76.2 | length 4.6
  Bottom w0.15: R76.2@104.7,83.65 108.857,83.65 109.017,83.81 DD2.125@109.22,83.81
NetDD3_53: DD3.53
NetDD3_56: DD3.56 R68.2 | length 7.6
  Top w0.2: R68.2@32.7,83.8 v1(34,83.8) ; v1(37.35,82.9) 38.2,83.75 DD3.56@39.45,83.75
  Bottom w0.2: v1(34,83.8) 34,83.665 34.765,82.9 v1(37.35,82.9)
NetDD3_57: DD3.57
NetDD3_59: DD3.59
NetDD3_62: DD3.62
NetDD3_63: DD3.63 R60.2 | length 12.7
  Top w0.2: DD3.63@39.45,80.25 37.9,80.25 37.35,79.7 37.35,78.4 40.45,75.3 42.95,75.3 44.05,74.2 44.05,74.15 44.4,73.8 R60.2@44.45,73.8
NetDD3_64: DD3.64 R62.2 | length 7.8
  Top w0.2: R62.2@32.7,78.6 33,78.9 v1(34,78.9) ; DD3.64@39.45,79.75 39.5,79.7 v1(39.5,78.9)
  Bottom w0.2: v1(34,78.9) v1(39.5,78.9)
NetDD3_65: DD3.65
NetDD3_67: DD3.67
NetDD3_70: DD3.70
NetDD3_72: DD3.72
NetDD3_73: DD3.73
NetDD3_75: DD3.75
NetDD3_76: DD3.76
NetDD3_78: DD3.78
NetDD3_79: DD3.79
NetDD3_81: DD3.81
NetDD3_85: DD3.85
NetDD3_86: DD3.86
NetDD3_88: DD3.88
NetDD3_91: DD3.91
NetDD3_93: DD3.93
NetDD3_94: DD3.94
NetDD3_96: DD3.96
NetDD3_97: DD3.97
NetDD3_99: DD3.99 R56.2 | length 3.3
  Top w0.2: DD3.99@58.3,77.9 v1(58.3,79.7)
  Bottom w0.2: R56.2@56.9,79.9 57.1,79.7 v1(58.3,79.7)
NetDD3_100: DD3.100
NetDD3_102: DD3.102
NetDD3_105: DD3.105
NetDD3_106: DD3.106 R48.2 | length 12.5
  Top w0.2: R48.2@58.25,73.8 58.35,73.9 60.35,73.9 63.65,77.2 63.65,80.6 63,81.25 DD3.106@61.65,81.25
NetDD3_107: DD3.107 R50.2 | length 3.2
  Top w0.2: DD3.107@61.65,81.75 61.675,81.775 63.375,81.775 v1(63.4,81.8)
  Bottom w0.2: v1(63.4,81.8) 64.4,81.8 R50.2@64.7,81.5
NetDD3_108: DD3.108
NetDD3_110: DD3.110
NetDD3_113: DD3.113
NetDD3_114: DD3.114
NetDD3_116: DD3.116
NetDD3_119: DD3.119
NetDD3_120: DD3.120
NetDD3_122: DD3.122
NetDD3_125: DD3.125 R75.2 | length 3.8
  Top w0.2: v1(59.65,90.8) 59.7,90.75 DD3.125@61.65,90.75
  Bottom w0.2: R75.2@57.95,90.7 58.05,90.8 v1(59.65,90.8)
NetR71_1: R71.1 VD2.2 | length 2.1
  Top w0.2: R71.1@90,12.4 VD2.2@90,14.4 VD2.2@90.1,14.3
NetVD3_2: VD3.2 VT1.3
NetVD4_2: VD4.2 VT2.3
NetX2_7: X2.7
NetX3_7: X3.7
NetX4_7: X4.7
NetX5_7: X5.7
NetX6_7: X6.7
NetX7_7: X7.7
NetX8_7: X8.7
NetX9_7: X9.7
NetX10_7: X10.7
NetX11_7: X11.7
NetX12_7: X12.7
NetX13_7: X13.7
NetX14_7: X14.7
NetX15_7: X15.7
NetX16_7: X16.7
NetX17_7: X17.7
nWP: DD4.7 R69.1 X1.4 | length 12.2
  Top w0.2: DD4.7@76.475,12.884 76.477,12.883 76.883,12.883 78.2,11.565 v1(78.2,10.2)
  Top w0.3: R69.1@74.666,12.884 DD4.7@76.475,12.884
  Top w0.5: R69.1@74.6,13.1 R69.1@74.716,12.984
  Bottom w0.2: v1(78.2,10.2) 78.85,9.55 78.85,5.51 X1.4@80,4.36
P3TXD: DD1.116 R18.2 R19.2 | length 16.2
  Top w0.15: DD1.116@60.2,35.84 60.33,35.97 71.58,35.97 R18.2@71.75,35.8
  Bottom w0.15: R19.2@55.75,35.8 55.84,35.71 60.07,35.71 DD1.116@60.2,35.84
P4TXD: DD1.119 R21.2 R23.2 | length 15.8
  Top w0.15: DD1.119@60.2,37.33 60.33,37.46 65.646,37.46 66.286,38.1 v1(71.75,38.1)
  Bottom w0.2: R23.2@68.45,36.6 68.8,36.95 70.6,36.95 v1(71.75,38.1)
P7TXD: DD1.125 R27.2 R32.2 | length 20.4
  Top w0.15: DD1.125@60.2,40.31 64.89,45 R32.2@71.75,45
  Bottom w0.15: R27.2@53.35,40.2 53.37,40.18 60.07,40.18 DD1.125@60.2,40.31
P8TXD: DD1.2 R5.2 R22.2 | length 23.6
  Top w0.15: R5.2@59.65,59.5 59.65,57.6 61.235,56.015 61.235,48.17 DD1.2@59.915,46.85
  Bottom w0.15: DD1.2@59.915,46.85 59.785,46.98 59.785,50.035 60.37,50.62 64.07,50.62 64.75,51.3 R22.2@64.75,52.3
P9TXD: DD1.4 R9.2 R26.2 | length 16.3
  Top w0.15: R9.2@57.35,59.5 57.35,57.57 59.02,55.9 DD1.4@59.02,49.4
  Bottom w0.2: DD1.4@59.02,49.4 59.02,50.57 60.75,52.3 R26.2@62.65,52.3
P11TXD: DD1.8 R17.2 R30.2 | length 14.5
  Top w0.2: R17.2@52.75,59.5 52.75,57.5 v1(53.95,56.3)
  Bottom w0.15: v1(53.95,56.3) 53.95,53.2 R30.2@53.75,53 53.75,52.95 55.315,51.385 55.315,48.47 DD1.8@56.935,46.85
R\E\S\E\T\: DD1.103 DD2.51 DD3.51 R73.1 SB1.2 | length 172.9
  Top w0.15: SB1.2@9.2,43 R73.1@14.6,43 14.85,42.75 43.886,42.75 50.75,35.886 50.75,32.3 53.909,29.141 62.606,29.141 DD1.103@62.75,29.285 ; R73.1@14.654,43.143 14.654,68.454 31.2,85 34.4,85 35.65,86.25 40.831,86.25 41.281,85.8 v1(41.3,85.8)
  Bottom w0.2: v1(41.3,85.8) 43.55,85.8 45.85,88.1 57.25,88.1 62.75,82.6 65.7,82.6 68.845,79.455 DD2.51@88.75,79.455
REFCLK_1: DD3.52 R44.1 | length 40.9
  Top w0.2: v1(37.25,69.6) 35.1,71.75 35.1,84 36.85,85.75 DD3.52@39.45,85.75
  Bottom w0.2: v1(37.25,69.6) 39.05,67.8 R44.1@39.05,49.8
REFCLK_2: DD2.52 R43.1 | length 16.7
  Top w0.15: R43.1@80.8,68.7 80.8,72.15 87.38,78.73 91.17,78.73 DD2.52@91.3,78.86
RX0: DD1.107 R45.1 | length 59.3
  Top w0.15: v1(66.95,29.9) 92.15,29.9 108.35,46.1 R45.1@108.35,49.8
  Bottom w0.15: DD1.107@60.19,31.37 60.32,31.5 65.35,31.5 v1(66.95,29.9)
RX0_N: DD3.2 R140.1 X17.6 | length 127.7
  Top w0.15: DD3.2@59.3,94.1 59.325,94.125 59.325,131.953 59.325,173.011 64.574,178.261 64.574,181.966 64.574,186.7 64.574,190.626 64.05,191.15 R140.1@64.05,191.2 64.05,191.25 64.577,191.777 64.575,191.779 64.575,195.261 66.182,196.868 66.831,197.517 ccw(c66.601,197.747) 66.831,197.977 66.41,198.397 cw(c66.64,198.627) 66.41,198.857 cw(c66.64,198.627) 66.87,198.857 67.29,198.436 ccw(c67.52,198.666) 67.75,198.436 ccw(c67.52,198.666) 67.75,198.896 67.329,199.316 cw(c67.559,199.546) 67.329,199.776 cw(c67.559,199.546) 67.789,199.776 68.21,199.356 ccw(c68.439,199.585) 68.669,199.356 69.182,199.868 69.332,200.018 71.632,202.318 71.85,202.536 71.85,205.4 71.25,206 67.55,206 67.15,205.6 67.15,205 67.323,204.827 68.137,204.827 X17.6@68.21,204.9
RX0_P: DD3.1 R139.1 X17.3 | length 127.9
  Top w0.15: DD3.1@59.8,94.1 59.775,94.125 59.775,132.139 59.775,172.825 65.024,178.074 65.024,181.966 65.024,186.7 65.024,190.621 65.55,191.146 R139.1@65.55,191.196 65.55,191.246 65.027,191.77 65.027,194.5 65.025,194.502 65.025,195.075 69.65,199.7 72.3,202.35 72.3,205.586 71.436,206.45 67.364,206.45 66.7,205.786 66.7,204.45 64.61,202.36 X17.3@64.4,202.36
RX1: DD1.109 R52.1 | length 52.2
  Top w0.15: DD1.109@62.74,32.265 91.215,32.265 106.05,47.1 R52.1@106.05,49.8
RX1_N: DD3.8 R136.1 X16.6 | length 128.2
  Top w0.15: R136.1@44.95,191.6 44.95,191.55 44.4,191 44.4,188.2 44.4,187 44.4,186.7 ccw(c44.725,186.7) 44.725,186.375 45.05,186.375 cw(c45.05,185.6) 45.825,185.6 cw(c45.05,185.6) 45.05,184.825 43.355,184.825 ccw(c43.355,184.5) 43.03,184.5 ccw(c43.355,184.5) 43.355,184.175 45.05,184.175 cw(c45.05,183.4) 45.825,183.4 cw(c45.05,183.4) 45.05,182.625 43.355,182.625 ccw(c43.355,182.3) 43.03,182.3 ccw(c43.355,182.3) 43.355,181.975 45.05,181.975 cw(c45.05,181.2) 45.825,181.2 cw(c45.05,181.2) 45.05,180.425 44.725,180.425 ccw(c44.725,180.1) 44.4,180.1 44.4,179.1 44.4,176.486 56.275,164.611 56.275,94.125 DD3.8@56.3,94.1 ; R136.1@44.975,191.65 44.95,191.65 44.575,192.025 44.575,192.05 44.45,192.175 44.45,192.707 44.45,194.1 44.45,200.2 46.435,202.185 X16.6@46.435,204.9
RX1_P: DD3.9 R135.1 X16.3 | length 127.9
  Top w0.15: X16.3@42.625,202.36 42.915,202.36 43.95,201.325 43.95,196.9 43.95,196.175 cw(c43.625,196.175) 43.625,195.85 42.775,195.85 ccw(c42.775,195.525) 42.45,195.525 ccw(c42.775,195.525) 42.775,195.2 43.625,195.2 cw(c43.625,194.875) 43.95,194.875 43.95,194.1 43.95,192.5 43.95,192.125 43.85,192.025 43.825,192.025 43.475,191.675 R135.1@43.475,191.65 ; R135.1@43.45,191.6 43.45,191.55 43.95,191.05 43.95,188.7 43.95,187 43.95,186.7 ccw(c44.725,186.7) 44.725,185.925 45.05,185.925 cw(c45.05,185.6) 45.375,185.6 cw(c45.05,185.6) 45.05,185.275 43.355,185.275 ccw(c43.355,184.5) 42.58,184.5 ccw(c43.355,184.5) 43.355,183.725 45.05,183.725 cw(c45.05,183.4) 45.375,183.4 cw(c45.05,183.4) 45.05,183.075 43.355,183.075 ccw(c43.355,182.3) 42.58,182.3 ccw(c43.355,182.3) 43.355,181.525 45.05,181.525 cw(c45.05,181.2) 45.375,181.2 cw(c45.05,181.2) 45.05,180.875 44.725,180.875 ccw(c44.725,180.1) 43.95,180.1 43.95,179.1 43.95,176.3 55.825,164.425 55.825,94.125 DD3.9@55.8,94.1
RX2: DD1.111 R58.1 | length 54
  Top w0.15: DD1.111@57.655,33.455 57.785,33.585 60.45,33.585 61.345,34.48 90.43,34.48 103.75,47.8 R58.1@103.75,49.8
RX2_N: DD3.12 R132.1 X15.6 | length 137.1
  Top w0.15: X15.6@24.715,204.9 24.642,204.827 23.828,204.827 23.655,205 23.655,205.6 24.055,206 27.755,206 28.355,205.4 28.355,202.741 26.689,201.076 26.281,200.667 cw(c26.051,200.897) 25.821,200.667 25.369,201.119 ccw(c25.139,200.89) 24.909,201.119 ccw(c25.139,200.89) 24.909,200.66 25.362,200.208 cw(c25.132,199.978) 25.362,199.748 cw(c25.132,199.978) 24.902,199.748 24.449,200.201 ccw(c24.22,199.971) 23.99,200.201 ccw(c24.22,199.971) 23.99,199.741 24.442,199.288 cw(c24.213,199.059) 24.442,198.829 24.389,198.776 23.95,198.336 23.95,192.915 25.915,190.951 25.915,190.208 R132.1@25.95,190.173 25.985,190.137 26.776,190.137 54.325,162.589 54.325,94.125 DD3.12@54.3,94.1
RX2_P: DD3.11 R131.1 X15.3 | length 137.1
  Top w0.15: X15.3@20.9,202.36 X15.3@20.926,202.36 ; X15.3@20.905,202.36 21.115,202.36 23.205,204.45 23.205,205.786 23.869,206.45 27.941,206.45 28.805,205.586 28.805,202.555 24.4,198.15 24.4,193.102 26.233,191.269 26.975,191.269 R131.1@27.011,191.233 27.046,191.198 27.046,190.504 27.07,190.48 54.775,162.775 54.775,94.125 DD3.11@54.8,94.1
RX3: DD1.117 R63.1 | length 50.5
  Top w0.15: v1(66.55,37.1) 90.05,37.1 101.45,48.5 R63.1@101.45,49.8
  Bottom w0.15: DD1.117@57.665,36.435 57.795,36.565 60.5,36.565 61.055,36.01 65.46,36.01 v1(66.55,37.1)
RX3_N: DD3.18 R128.1 X14.6 | length 130.7
  Top w0.15: X14.6@11.65,179.36 15.49,179.36 16.275,178.575 23.575,178.575 24.1,179.1 R128.1@24.15,179.1 24.2,179.1 24.725,178.575 27.511,178.575 30.018,176.068 30.23,175.856 ccw(c30.46,176.086) 30.69,175.856 30.973,176.139 cw(c31.521,175.591) 32.069,176.139 cw(c31.521,175.591) 32.069,175.043 30.725,173.699 ccw(c30.955,173.47) 30.725,173.24 ccw(c30.955,173.47) 31.184,173.239 32.528,174.583 cw(c33.076,174.035) 33.624,174.583 cw(c33.076,174.035) 33.624,173.487 ; 33.624,173.486 32.281,172.144 ccw(c32.511,171.914) 32.281,171.684 ccw(c32.511,171.914) 32.74,171.684 34.084,173.028 cw(c34.632,172.48) 35.18,173.028 cw(c34.632,172.48) 35.18,171.932 ; 35.179,171.931 33.837,170.588 ccw(c34.066,170.358) 33.837,170.129 ccw(c34.066,170.358) 34.296,170.128 35.64,171.472 cw(c36.188,170.924) 36.736,171.472 cw(c36.188,170.924) 36.736,170.376 ; 36.735,170.375 35.392,169.033 ccw(c35.622,168.803) 35.392,168.573 ccw(c35.622,168.803) 35.851,168.572 36.135,168.856 cw(c36.683,168.308) 37.231,168.856 38.368,167.718 51.275,154.811 51.275,94.125 DD3.18@51.3,94.1
RX3_P: DD3.19 R127.1 X14.3 | length 130.7
  Top w0.15: X14.3@14.19,175.55 14.19,175.84 16.475,178.125 18.05,178.125 18.775,178.125 cw(c18.775,177.8) 19.1,177.8 19.1,176.984 ccw(c19.425,176.984) 19.425,176.659 ccw(c19.425,176.984) 19.75,176.984 19.75,177.8 cw(c20.075,177.8) 20.075,178.125 21.35,178.125 23.575,178.125 24.1,177.6 R127.1@24.15,177.6 24.2,177.6 24.725,178.125 27.325,178.125 29.7,175.75 29.911,175.539 ccw(c30.46,176.086) 31.008,175.538 31.291,175.821 cw(c31.521,175.591) 31.751,175.821 cw(c31.521,175.591) 31.751,175.362 30.407,174.018 ccw(c30.955,173.47) 30.407,172.922 ccw(c30.955,173.47) 31.503,172.922 ; 31.504,172.922 32.847,174.265 cw(c33.076,174.035) 33.306,174.265 cw(c33.076,174.035) 33.307,173.806 31.963,172.462 ccw(c32.511,171.914) 31.963,171.366 ccw(c32.511,171.914) 33.059,171.366 ; 33.06,171.367 34.402,172.709 cw(c34.632,172.48) 34.862,172.709 cw(c34.632,172.48) 34.862,172.25 33.518,170.906 ccw(c34.066,170.358) 33.518,169.81 ccw(c34.066,170.358) 34.614,169.81 ; 34.615,169.811 35.958,171.154 cw(c36.188,170.924) 36.417,171.154 cw(c36.188,170.924) 36.418,170.695 35.074,169.351 ccw(c35.622,168.803) 35.074,168.255 ccw(c35.622,168.803) 36.17,168.255 ; 36.171,168.256 36.453,168.538 cw(c36.683,168.308) 36.912,168.538 38.05,167.4 50.825,154.625 50.825,94.125 DD3.19@50.8,94.1
RX4: DD1.120 R46.1 | length 47
  Top w0.15: v1(65.75,39.3) 89.65,39.3 99.15,48.8 R46.1@99.15,49.8
  Bottom w0.15: DD1.120@57.665,37.925 57.795,38.055 61.555,38.055 62.45,38.95 65.383,38.95 65.733,39.3 v1(65.75,39.3)
RX4_N: DD3.21 R108.1 X9.6 | length 102.8
  Top w0.15: X9.6@11.65,157.66 11.723,157.587 11.723,156.773 11.55,156.6 10.95,156.6 10.55,157 10.55,160.7 11.15,161.3 14.014,161.3 14.232,161.082 16.532,158.782 16.682,158.632 17.194,158.119 cw(c16.965,157.889) 17.194,157.66 16.593,157.058 ccw(c16.823,156.829) 16.593,156.599 ccw(c16.823,156.829) 17.053,156.599 17.654,157.2 cw(c17.884,156.97) 18.114,157.2 cw(c17.884,156.97) 18.114,156.74 17.546,156.172 ccw(c17.775,155.942) 17.546,155.713 ccw(c17.775,155.942) 18.005,155.713 18.573,156.281 cw(c18.803,156.051) 19.033,156.281 19.682,155.632 21.289,154.025 27.875,154.025 28.4,153.5 R108.1@28.45,153.5 28.5,153.5 29.025,154.025 31.218,154.025 49.825,135.418 49.825,94.125 DD3.21@49.8,94.1
RX4_P: DD3.20 R107.1 X9.3 | length 102.8
  Top w0.15: X9.3@14.19,153.85 14.19,154.06 12.1,156.15 10.764,156.15 10.1,156.814 10.1,160.886 10.964,161.75 14.2,161.75 16.532,159.418 16.85,159.1 21.475,154.475 27.645,154.475 27.875,154.475 28.4,155 R107.1@28.45,155 28.5,155 29.025,154.475 31.404,154.475 50.275,135.604 50.275,94.125 DD3.20@50.3,94.1
RX5: DD1.122 R51.1 | length 41.9
  Top w0.15: DD1.122@60.2,38.82 60.33,38.95 63.01,38.95 65.56,41.5 89.75,41.5 96.85,48.6 R51.1@96.85,49.8